# Altium PCB bdcmc25_revised.PcbDoc (part 3 of 4)
Units mil, origin at the board's own origin, x right, y up, seen from the top; angles counter-clockwise.
Board outline 7000 x 2750 mil, 4 copper layers (Top Layer, Layer 2 (GND), Layer 3 (GND), Bottom Layer), stack 23.756 mil thick; 347 components, 158 nets, 1046 pads, 1117 vias.
Unrouted connection lines stored in the file: 6.
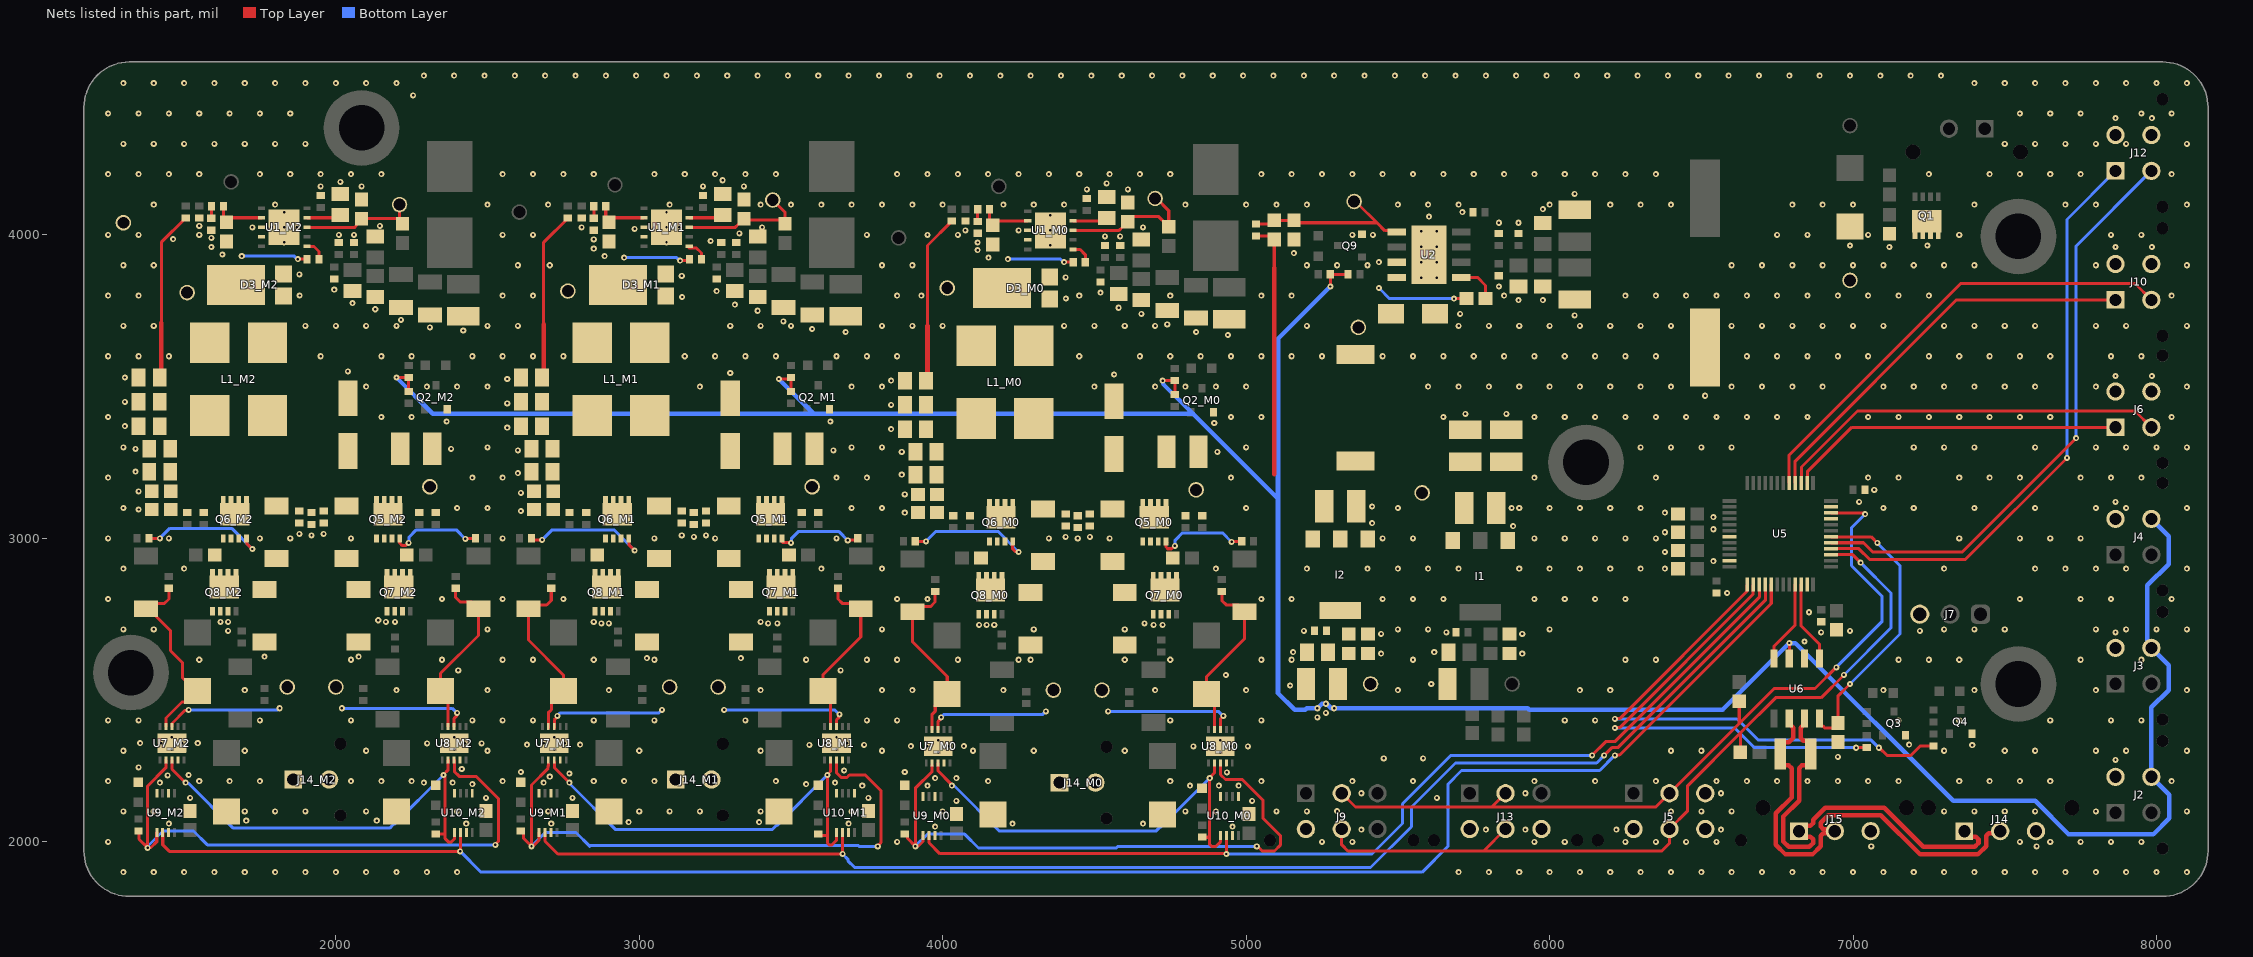
[diagram p4: the nets of this part, all layers, seen from the top]

## Via types
v1: diameter 20, hole 8, Top Layer to Bottom Layer, 1102 vias
v2: diameter 20, hole 7.87, Top Layer to Bottom Layer, 15 vias

## Nets (pads, with @x,y where several pads share a name; then routed paths per layer and width w, separated by ;. In a path a pad name is that pad's centre, name@x,y a point inside that pad or via, vN(x,y) a via of type N, cw(c..) or ccw(c..) an arc to the next point about the centre after c; other vN are vias at no path point) (continued)
NetC23_M1_1: (continued)
  Top Layer w10: U1_M1.1@3164.8,3957.01 3187.99,3957.01 3205,3940 3205,3915.32 C23_M1.1@3204.68,3915
NetC23_M1_2: C23_M1.2 D3_M1.2 L1_M1.1 SW_M1.1 U1_M1.9 | length 219.5
  Top Layer w10: v1(3135,3915) C23_M1.2@3165.32,3915
  Bottom Layer w10: v1(2950,3925) 3123.38,3925 3133.38,3915 v1(3135,3915)
NetC23_M2_1: C23_M2.1 U1_M2.1 | length 72.4
  Top Layer w10: U1_M2.1@1904.8,3962.01 1927.99,3962.01 1945,3945 1945,3920.32 C23_M2.1@1944.68,3920
NetC23_M2_2: C23_M2.2 D3_M2.2 L1_M2.1 SW_M2.1 U1_M2.9 | length 219.5
  Top Layer w10: v1(1875,3920) C23_M2.2@1905.32,3920
  Bottom Layer w10: v1(1690,3930) 1863.38,3930 1873.38,3920 v1(1875,3920)
NetC27_M0_2: C27_M0.2 U1_M0.4 | length 113.9
  Top Layer w10: U1_M0.4@4429.8,4046.5 4531.14,4046.5 C27_M0.2@4540,4055.35
NetC27_M1_2: C27_M1.2 U1_M1.4 | length 111.8
  Top Layer w10: U1_M1.4@3164.8,4056.5 3271.14,4056.5 C27_M1.2@3275,4060.35
NetC27_M2_2: C27_M2.2 U1_M2.4 | length 113.9
  Top Layer w10: U1_M2.4@1904.8,4056.5 2006.14,4056.5 C27_M2.2@2015,4065.35
NetC28_M0_2: C28_M0.2 R8_M0.2 U1_M0.7 | length 174.2
  Top Layer w10: R8_M0.2@4154.69,4085 4154.69,4045.32 4165,4035 4176.5,4046.5 U1_M0.7@4280.2,4046.5
NetC28_M1_2: C28_M1.2 R8_M1.2 U1_M1.7 | length 176.3
  Top Layer w10: R8_M1.2@2889.68,4090 2889.68,4050.32 2900,4040 2916.5,4056.5 U1_M1.7@3015.2,4056.5
NetC28_M2_2: C28_M2.2 R8_M2.2 U1_M2.7 | length 174.2
  Top Layer w10: R8_M2.2@1629.68,4095 1629.68,4055.32 1640,4045 1651.5,4056.5 U1_M2.7@1755.2,4056.5
NetC29_M0_2: C29_M0.2 R8_M0.1 | length 40.4
  Top Layer w10: C29_M0.2@4115,4044.68 4115.16,4044.84 4115.16,4084.84 R8_M0.1@4115.31,4085
NetC29_M1_2: C29_M1.2 R8_M1.1 | length 40.4
  Top Layer w10: C29_M1.2@2850,4049.68 2850.16,4049.84 2850.16,4089.84 R8_M1.1@2850.32,4090
NetC29_M2_2: C29_M2.2 R8_M2.1 | length 40.4
  Top Layer w10: C29_M2.2@1590,4054.68 1590.16,4054.84 1590.16,4094.84 R8_M2.1@1590.32,4095
NetC30_1: C30.1 U2.1 | length 134.7
  Top Layer w10: U2.1@5708.89,3860 5762.59,3860 5789.08,3833.5 C30.1@5789.08,3790
NetC30_2: C30.2 D20.2 L2.1 SW_7V.1 U2.8 | length 303
  Top Layer w10: v1(5685,3790) C30.2@5726.09,3790
  Bottom Layer w10: v1(5437.59,3825) 5472.59,3790 v1(5685,3790)
NetC36_2: C36.2 FB_7V.1 R11.1 R13.2 U2.5 | length 604.4
  Top Layer w10: C36.2@5032.59,4036.18 5080.78,4036.18 R11.1@5092.59,4047.99 R13.2@5157.59,4047.99 5165.58,4040 5431.01,4040 ; FB_7V.1@5348.14,4118 5364.02,4102.12 5368.89,4102.12 5431.01,4040 ; FB_7V.1@5359.22,4118.06 FB_7V.1@5359.22,4122.93 ; U2.5@5496.29,4010 5492.33,4013.95 5457.05,4013.95 5431.01,4040